# Altium PCB TL-WR703N.PcbDoc (part 3 of 3)
Units mm, origin at the board's own origin, x right, y up, seen from the top; angles counter-clockwise.
Board outline 48.52 x 50.08 mm, 2 copper layers (Top, Bottom); 241 components, 226 nets, 742 pads, 501 vias.
Unrouted connection lines stored in the file: 88.
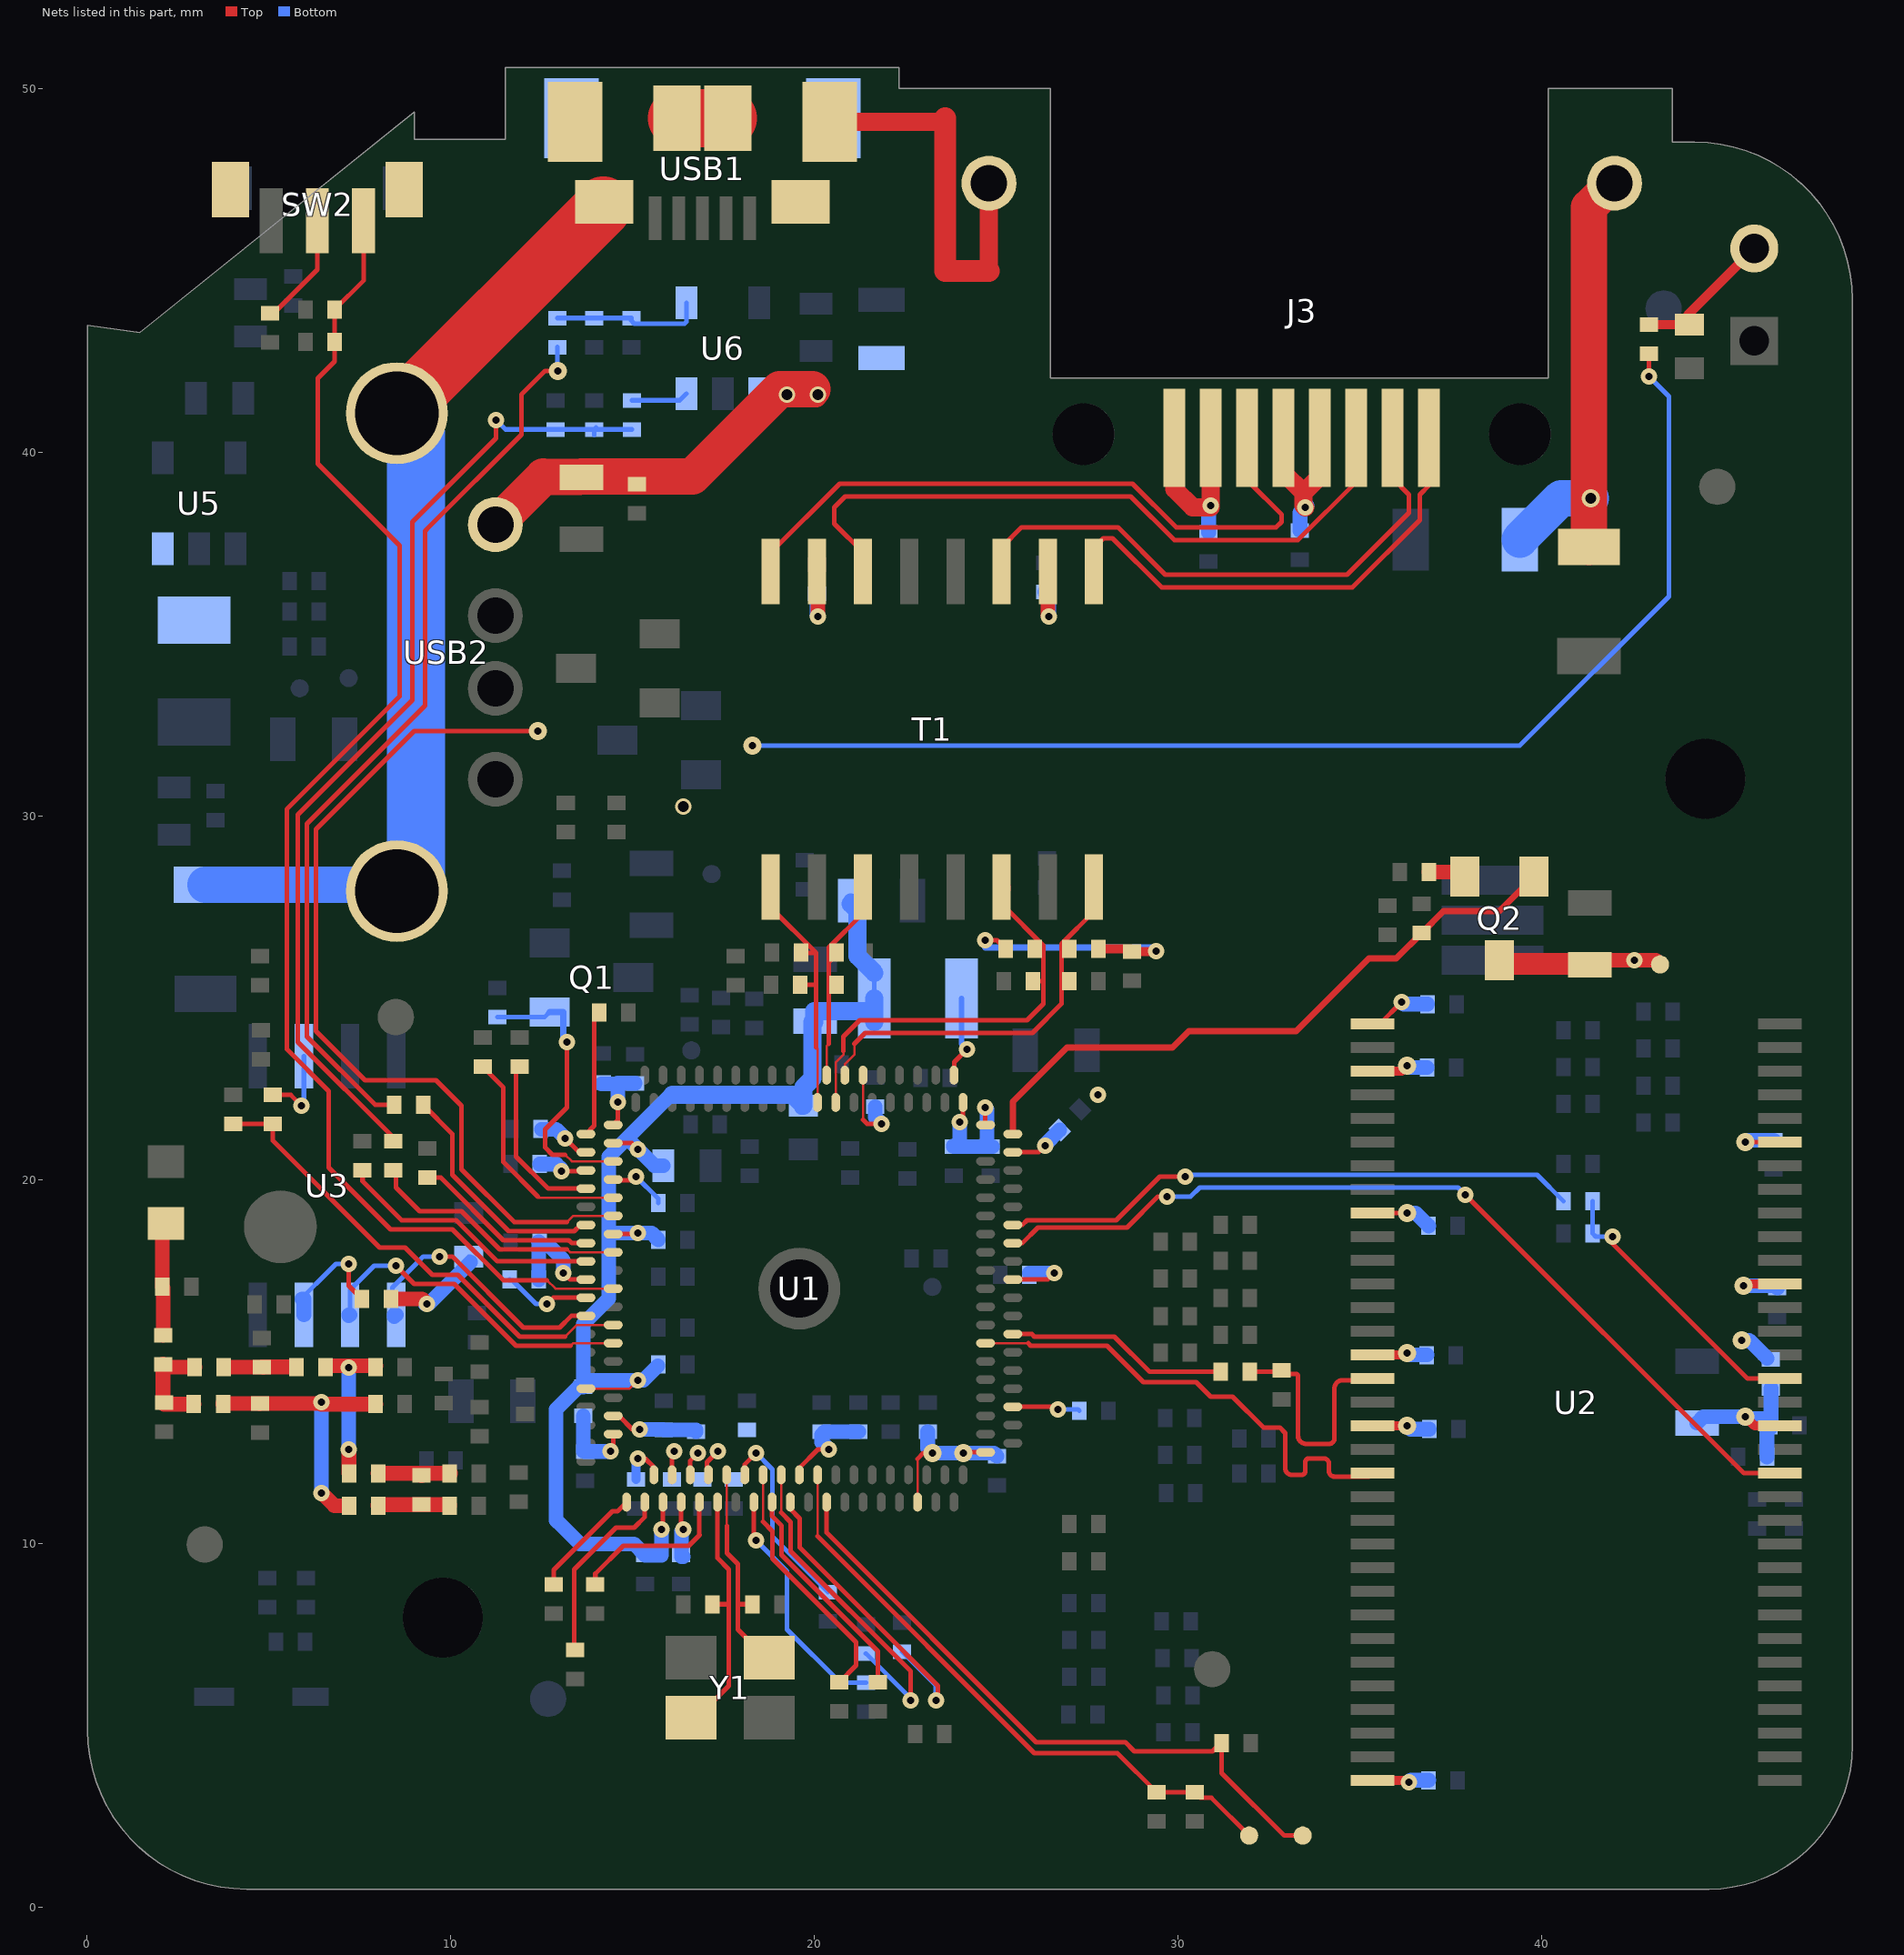
[diagram p3: the nets of this part, all layers, seen from the top]

## Via types
v1: diameter 0.45, hole 0.3, Top to Bottom, 286 vias
v2: diameter 0.45, hole 0.2, Top to Bottom, 152 vias
v3: diameter 0.6, hole 0.4, Top to Bottom, 31 vias
v4: diameter 0.5, hole 0.2, Top to Bottom, 21 vias
v5: diameter 0.5, hole 0.3, Top to Bottom, 11 vias

## Nets (pads, with @x,y where several pads share a name; then routed paths per layer and width w, separated by ;. In a path a pad name is that pad's centre, name@x,y a point inside that pad or via, vN(x,y) a via of type N, cw(c..) or ccw(c..) an arc to the next point about the centre after c; other vN are vias at no path point) (continued)
GPIO1: R2.2 U1.A77 | length 8.9
  Top w0.127: U1.A77@19.35,11.131 19.35,10.943 19.611,10.682 19.611,9.882 21.611,7.882 23.411,6.082 23.411,5.732 v2(23.361,5.682)
  Bottom w0.127: R2.2@22.417,7.021 23.35,6.088 23.35,5.7 23.35,5.682 v2(23.361,5.682)
GPIO6: R16.2 U1.B46 | length 7.2
  Top w0.064: 13.211,18.082 13.293,18 U1.B46@14.481,18
  Top w0.127: R16.2@8.428,20.256 8.511,20.173 8.511,19.782 9.161,19.132 10.311,19.132 11.361,18.082 13.211,18.082
GPIO7: R15.2 U1.A54 | length 7.4
  Top w0.127: R15.2@7.589,20.256 7.589,19.954 8.661,18.882 10.161,18.882 11.293,17.75 U1.A54@13.731,17.75
GPIO8: R18.2 U1.A52 | length 6.6
  Top w0.127: R18.2@9.259,22.053 10.061,21.251 10.061,20.132 11.611,18.582 ; 11.611,18.582 11.661,18.582 13.411,18.582 13.579,18.75 U1.A52@13.731,18.75
GPIO11: C62.2 R92.2 SW2.3 U1.B48 | length 38.4
  Top w0.064: 12.661,17.232 12.893,17 U1.B48@14.481,17
  Top w0.127: SW2.3@7.616,46.36 7.616,44.713 C62.2@6.823,43.92 R92.2@6.823,43.031 6.823,42.494 6.361,42.032 6.361,39.682 8.611,37.432 8.611,33.282 5.511,30.182 5.511,23.582 6.661,22.432 6.661,20.332 8.361,18.632 10.061,18.632 11.461,17.232 12.661,17.232
GPIO13: R3.2 U1.B66 | length 9.5
  Top w0.064: 19.1,10.843 U1.B66@19.1,11.881
  Top w0.127: 19.1,10.843 19.361,10.582 19.361,9.782 22.661,6.482 v2(22.661,5.682)
  Bottom w0.127: R3.2@21.428,6.971 22.661,5.738 22.661,5.732 v2(22.661,5.682)
GPIO14: R11.2 U1.A76 | length 6.2
  Top w0.127: U1.A76@18.85,11.131 18.85,10.743 19.111,10.482 19.111,9.682 21.761,7.032 21.759,7.03 R11.2@21.759,6.174
GPIO15: R12.2 U1.B65 | length 7
  Top w0.064: 18.6,10.593 U1.B65@18.6,11.881
  Top w0.127: 18.6,10.593 18.861,10.332 18.861,9.582 21.161,7.282 21.161,6.642 R12.2@20.693,6.174
GPIO16: R13.1 U1.A75 | length 6.6
  Top w0.127: U1.A75@18.35,11.131 18.35,10.143 v2(18.411,10.082)
  Bottom w0.127: v2(18.411,10.082) 19.261,9.232 19.261,7.632 20.723,6.17 R13.1@21.428,6.17
GPIO17: R14.1 U1.B64 | length 5.4
  Top w0.127: U1.B64@18.1,11.881 18.1,12.171 v2(18.411,12.482)
  Bottom w0.127: v2(18.411,12.482) 18.861,12.032 18.861,11.982 ; 18.861,11.932 18.861,11.982 ; R14.1@20.385,8.66 18.861,10.184 18.861,11.982
GPIO29: R17.2 U1.A53 | length 5.1
  Top w0.127: R17.2@9.367,20.052 9.741,20.052 11.461,18.332 13.261,18.332 13.343,18.25 U1.A53@13.731,18.25
LDM: U1.B7 U2.20 | length 13.6
  Top w0.064: U1.B7@24.719,15.5 25.893,15.5
  Top w0.127: 25.893,15.5 25.961,15.432 28.061,15.432 29.061,14.432 30.511,14.432 30.911,14.032 31.511,14.032 32.361,13.182 32.811,13.182 32.961,13.032 32.961,12.032 ccw(c33.136,12.057) 33.161,11.882 33.411,11.882 ccw(c33.411,11.982) 33.511,11.982 33.511,12.232 cw(c33.611,12.232) 33.611,12.332 34.011,12.332 cw(c34.011,12.182) 34.161,12.182 34.161,11.982 ccw(c34.311,11.982) 34.311,11.832 34.961,11.832 cw(c34.986,11.807) 35.011,11.832 U2.20@35.261,11.832 ; U2.20@35.355,11.925 U2.20@35.261,11.832 ; U2.20@35.355,11.925 U2.20@35.262,11.832
LDO: R16.1 R107.1 R108.1 R110.1 | length 27.4
  Top w0.127: R16.1@8.428,21.056 8.428,21.165 5.811,23.782 5.811,30.032 8.961,33.182 8.961,38.082 11.261,40.382 v2(11.261,40.882)
  Bottom w0.127: v2(11.261,40.882) 11.521,40.622 R110.1@12.896,40.622 R108.1@13.962,40.622 ; R108.1@13.962,40.472 R108.1@13.962,40.622 ; R108.1@13.962,40.482 R108.1@13.962,40.622 ; R108.1@14.011,40.682 R108.1@14.011,40.622 ; R107.1@15.001,40.622 R108.1@14.011,40.622 ; R108.1@13.962,40.622 R108.1@14.011,40.622
LDQS: R50.2 U1.A9 | length 6.1
  Top w0.127: U1.A9@25.469,15.75 25.993,15.75 26.061,15.682 28.261,15.682 29.229,14.714 R50.2@31.184,14.714
LDQS_B: R50.1 R52.1 U2.16 | length 7
  Top w0.127: R50.1@31.984,14.714 32.811,14.714 32.811,14.682 32.854,14.682 32.854,14.756 32.854,14.656 33.237,14.656 cw(c33.237,14.582) 33.311,14.582 33.311,12.982 ccw(c33.536,12.957) 33.511,12.732 34.161,12.732 ccw(c34.161,12.882) 34.311,12.882 34.311,14.282 cw(c34.536,14.257) 34.561,14.482 35.298,14.482 cw(c35.348,14.475) U2.16@35.355,14.525
LED3: R83.1 U1.B44 | length 58.1
  Top w0.064: 13.211,18.832 13.379,19 U1.B44@14.481,19
  Top w0.127: v4(12.411,32.332) 9.011,32.332 6.311,29.632 6.311,24.082 7.661,22.732 9.611,22.732 10.311,22.032 10.311,20.282 11.761,18.832 13.211,18.832 ; R83.1@42.96,42.708 42.96,42.633 R83.1@42.961,42.632 ; v2(42.961,42.082) R83.1@42.961,42.632 ; R83.1@43.011,42.682 R83.1@42.961,42.632
  Bottom w0.127: v4(18.311,31.932) 39.411,31.932 43.511,36.032 43.511,41.532 v2(42.961,42.082)
LX: L14.2 U5.3
N$1: C79.1 U1.A71 | length 1.4
  Top w0.127: U1.A71@16.35,11.131 16.35,10.443 v2(16.411,10.382)
  Bottom w0.406: C79.1@16.361,9.732 16.361,10.332 v2(16.411,10.382)
N$2: 
  other v1: 16.403,30.25
RD+: C50.2 R76.2 T1.6 U1.B27 | length 12.3
  Top w0.064: U1.B27@20.6,22.119 20.6,23.221 20.811,23.432 20.811,23.532
  Top w0.127: 20.811,23.532 20.811,23.932 21.261,24.382 25.861,24.382 26.311,24.832 26.311,25.282 ; T1.6@25.211,27.982 25.211,27.532 26.311,26.432 ; C50.2@26.019,25.455 26.311,25.455 ; R76.2@26.069,26.344 26.311,26.344 ; 26.311,25.282 26.311,25.455 ; 26.311,25.282 26.311,25.455 ; 26.311,25.455 26.311,26.282 26.311,26.344 ; 26.311,26.344 26.311,26.432 ; 26.311,26.344 26.311,26.432
  Top w0.406: T1.6@25.161,28.041 25.211,28.04 T1.6@25.211,27.982
RD-: C53.1 R77.1 T1.8 U1.A31 | length 11.4
  Top w0.064: U1.A31@20.85,22.869 20.85,23.171 21.111,23.432 21.111,23.732
  Top w0.127: 21.111,23.732 21.411,24.032 26.011,24.032 26.811,24.832 26.811,25.382 ; C53.1@27.02,25.455 27.02,25.382 26.811,25.382 ; T1.8@27.701,28.041 27.701,27.372 26.811,26.482 26.811,26.344 ; 26.811,25.382 26.811,26.182 26.811,26.344 ; 26.811,26.344 R77.1@27.02,26.344 26.811,26.344
RX+: J3.7 T1.11 | length 15.6
  Top w0.127: T1.11@25.161,36.715 25.161,37.382 25.711,37.932 28.361,37.932 29.661,36.632 34.661,36.632 36.361,38.332 36.361,38.832 35.912,39.281 J3.7@35.912,40.391
RX-: J3.8 T1.9 | length 13.4
  Top w0.127: T1.9@27.701,36.715 27.701,37.372 27.961,37.632 28.211,37.632 29.561,36.282 34.811,36.282 36.661,38.132 36.661,38.832 36.912,39.083 J3.8@36.912,40.391
RX_GND: R71.2 T1.10 | length 2
  Top w0.406: T1.10@26.431,36.715 26.431,35.512 v2(26.461,35.482)
  Bottom w0.406: R71.2@26.354,36.154 26.461,36.047 v2(26.461,35.482)
S$15: C99.2 C100.2 U1.B67 | length 2.8
  Top w0.127: U1.B67@19.6,11.881 19.6,12.071 20.111,12.582 v2(20.411,12.582)
  Bottom w0.127: C100.2@20.208,13.067 C100.2@20.296,13.067
  Bottom w0.406: v2(20.411,12.582) 20.211,12.782 20.211,12.982 20.296,13.067 C99.2@21.224,13.067
S$17: C19.1 C20.2 L3.2 L7.2 | length 7.7
  Top w0.406: L3.2@3.752,13.825 3.752,13.844 3.802,13.844 C20.2@4.761,13.844 ; C20.2@4.761,13.832 C20.2@4.761,13.844 ; v2(6.461,11.382) 6.812,11.031 L7.2@7.216,11.031 ; v2@6.461,13.832 v2@6.461,13.825 ; C19.1@7.951,13.825 v2@6.461,13.825 ; C20.2@4.761,13.844 C20.2@4.772,13.844 6.461,13.844 v2(6.461,13.882) v2@6.461,13.825
  Bottom w0.406: v2(6.461,11.382) v2(6.461,13.882)
S$18: C3.1 C38.1 C80.1 C82.2 C104.1 C105.1 L1.2 L13.1 R94.1 U1.A61 U1.A70 U1.B40 | length 36.5
  Top w0.064: U1.A61@13.731,14.25 14.929,14.25 v2(15.161,14.482)
  Top w0.127: U1.B40@14.481,21 14.993,21 v2(15.161,20.832) ; v2(15.811,10.382) 15.85,10.421 U1.A70@15.85,11.131
  Bottom w0.127: L1.2@13.527,14.298 L1.2@13.658,14.298 ; C82.2@15.711,14.882 15.711,14.904 C82.2@15.721,14.914 ; 16.111,22.332 16.111,22.382 ; C105.1@19.962,23.169 C105.1@19.962,23.182 ; C104.1@19.962,24.332 C104.1@19.962,24.351 ; L13.1@21.661,24.982 L13.1@21.661,25.682
  Bottom w0.406: L1.2@13.527,14.298 12.911,13.682 12.911,10.632 12.961,10.582 13.561,9.982 15.053,9.982 15.359,9.676 15.811,9.676 v2(15.811,10.382) ; C82.2@15.711,14.882 15.311,14.482 v2(15.161,14.482) 15.111,14.482 13.658,14.482 L1.2@13.658,14.298 13.661,14.298 13.661,16.032 14.361,16.732 14.361,20.632 14.861,21.132 ; C3.1@15.861,20.382 15.611,20.382 v2(15.161,20.832) 14.861,21.132 ; 16.111,22.382 14.861,21.132 ; 16.361,9.632 16.411,9.632 ; R94.1@19.661,21.982 R94.1@19.711,22.032 ; C104.1@19.962,24.351 C104.1@20.031,24.351 ; C38.1@21.009,27.664 21.011,27.664 C38.1@21.011,27.582
  Bottom w0.5: 16.111,22.332 19.411,22.332 ; R94.1@19.711,22.032 19.411,22.332 ; R94.1@19.711,22.132 19.711,22.332 ; C105.1@19.961,23.182 19.961,22.782 19.711,22.532 19.711,22.332 ; C105.1@19.962,23.169 19.962,24.332 20.011,24.332 20.011,24.632 20.311,24.632 21.661,24.632 L13.1@21.661,24.982 L13.1@21.661,24.332 ; C38.1@21.011,27.582 21.2,27.393 21.2,26.25 21.2,26.143 L13.1@21.661,25.682 ; 19.411,22.332 19.711,22.332
S$36: C65.1 U1.A12 | length 2
  Top w0.127: U1.A12@25.469,17.25 26.429,17.25 v2(26.611,17.432)
  Bottom w0.127: C65.1@25.915,17.377 25.92,17.382 C65.1@25.92,17.432
  Bottom w0.406: C65.1@25.92,17.432 v2(26.611,17.432)
S$44: C16.2 C17.2 R59.2 R61.1 U2.49 | length 5.4
  Top w0.254: v4(45.611,13.482) 45.868,13.225 U2.49@46.555,13.225
  Bottom w0.127: v4@45.611,13.432 v4(45.611,13.482) ; C17.2@46.293,13.24 46.311,13.222 C17.2@46.311,13.182
  Bottom w0.406: C16.2@44.28,13.302 44.46,13.482 v4(45.611,13.482) ; v4@45.611,13.432 46.311,13.432 46.311,13.182 46.204,13.075 R61.1@46.204,12.374 ; C17.2@46.293,13.24 46.312,13.24 R59.2@46.312,14.26
S$48: 
S$54: C51.2 R76.1 R77.2 | length 7.3
  Top w0.127: v2(24.711,26.582) 25.031,26.582 R76.1@25.269,26.344 ; C51.2@28.711,26.344 28.74,26.344 C51.2@28.74,26.263
  Top w0.254: R77.2@27.82,26.344 C51.2@28.711,26.344 ; C51.2@28.74,26.263 29.411,26.263 v2(29.411,26.282)
  Bottom w0.175: v2(24.711,26.582) 24.711,26.382 24.911,26.382 28.361,26.382 29.311,26.382 v2(29.411,26.282)
S$55: LED2.K LED3.C R83.2 | length 4
  Top w0.127: LED3.C@43.972,43.508 44.018,43.554 LED3.C@44.026,43.554
  Top w0.254: R83.2@42.96,43.508 LED3.C@43.972,43.508 ; LED3.C@44.076,43.504 44.026,43.554 44.026,43.77 LED2.K@45.854,45.598
S$69: 
S$70: 
S$73: C34.1 L6.2 L7.1 | length 2
  Top w0.406: L7.1@8.016,11.031 8.016,11.062 C34.1@9.213,11.062 9.983,11.062 L6.2@9.983,11.031
S$76: C1.1 L1.1 U1.B56 | length 2.2
  Top w0.127: v2(14.411,12.532) 14.481,12.602 U1.B56@14.481,13
  Bottom w0.127: C1.1@13.661,12.532 13.708,12.532 C1.1@13.708,12.52
  Bottom w0.406: L1.1@13.658,13.498 13.658,12.532 C1.1@13.661,12.532 ; C1.1@13.708,12.52 14.399,12.52 v2(14.411,12.532)
S$78: R58.1 R95.2 | length 3
  Top w0.406: R58.1@8.37,16.719 9.224,16.719 v2(9.361,16.582)
  Bottom w0.127: R95.2@10.511,17.882 10.561,17.882 R95.2@10.561,17.732
  Bottom w0.406: v2@9.311,16.582 v2(9.361,16.582) 9.411,16.582 R95.2@10.561,17.732
S$80: C21.2 C27.1 C28.1 L3.1 | length 2.9
  Top w0.406: L3.1@2.952,13.825 2.132,13.825 2.132,13.867 2.105,13.867 C28.1@2.105,14.922 2.105,14.841 C27.1@2.975,14.841
S$87: C28.2 C30.1 J1.1 | length 3.2
  Top w0.406: C28.2@2.105,15.722 2.105,15.782 2.111,15.782 2.111,17.025 C30.1@2.086,17.05 2.086,18.79 J1.1@2.182,18.79
S$94: C26.1 C27.2 L5.1 | length 2.1
  Top w0.406: C27.2@3.775,14.841 L5.1@4.861,14.841 ; L5.1@4.861,14.832 L5.1@4.861,14.841 ; C26.1@5.769,14.841 5.769,14.845 L5.1@4.822,14.845 4.822,14.841 L5.1@4.861,14.841
S$95: R20.1 U1.A47 | length 3.5
  Top w0.127: U1.A47@13.731,21.25 13.961,21.48 13.961,21.932 13.961,24.457 R20.1@14.097,24.593
S$102: C86.2 U1.B42 | length 1.7
  Top w0.127: U1.B42@14.481,20 14.461,20 14.461,19.982 14.511,19.982 15.011,19.982 v2(15.111,20.082)
  Bottom w0.127: v2(15.111,20.082) 15.721,19.472 C86.2@15.721,19.359
S$103: C5.1 C87.1 U1.B19 U1.B20 | length 4.2
  Top w0.127: v2(24.011,21.582) 24.1,21.671 U1.B20@24.1,22.119 ; v2(24.711,21.982) 24.711,21.932 24.711,21.508 U1.B19@24.719,21.5
  Bottom w0.406: v2(24.011,21.582) 24.011,20.932 23.841,20.932 C87.1@23.841,20.902 C5.1@24.761,20.902 ; v2(24.711,21.982) 24.761,21.932 C5.1@24.761,20.902 ; C5.1@24.911,20.902 C5.1@24.857,20.902 ; C5.1@24.761,20.902 C5.1@24.857,20.902 ; C5.1@24.761,20.902 C5.1@24.857,20.902
S$106: R91.2 SW2.2 | length 3.2
  Top w0.127: R91.2@5.049,43.812 5.049,43.794 5.061,43.782 5.111,43.782 6.346,45.017 SW2.2@6.346,46.36
S$107: SW2.S$1 SW2.S$2
S$109: 
S$110: USB1.P$1 USB1.P$2
S$111: 
S$114: C35.2 U1.A72 | length 4.5
  Top w0.127: C35.2@13.989,8.864 13.989,9.16 14.761,9.932 16.561,9.932 16.861,10.232 16.85,10.243 U1.A72@16.85,11.131
S$115: L11.2 U1.A69 | length 5.2
  Top w0.127: L11.2@13.412,7.082 L11.2@13.431,7.063 ; L11.2@13.461,7.032 13.411,7.082 13.411,9.282 14.561,10.432 15.061,10.432 15.35,10.721 U1.A69@15.35,11.131
S$116: R7.1 U1.B59 | length 1.3
  Top w0.127: v2(15.161,12.332) 15.361,12.332 15.6,12.093 U1.B59@15.6,11.881
  Bottom w0.254: R7.1@15.105,11.758 15.111,11.764 15.111,12.282 v2(15.161,12.332)
S$117: C88.1 C89.1 C90.1 R96.1 U1.B60 U1.B61 U1.B62 | length 2.3
  Top w0.127: U1.B60@16.1,11.881 16.1,12.471 v2(16.161,12.532) v2@16.161,12.432 ; U1.B61@16.6,11.881 16.6,12.271 v2(16.811,12.482) ; U1.B62@17.1,11.881 17.061,11.92 17.061,11.932 17.061,12.232 v2(17.361,12.532)
S$121: C63.2 U1.A19 | length 1.6
  Top w0.127: U1.A19@25.469,20.75 26.179,20.75 v2(26.361,20.932)
  Bottom w0.406: v2(26.361,20.932) 26.361,20.967 C63.2@26.756,21.362
S$122: C81.2 U1.B45 | length 2.1
  Top w0.127: U1.B45@14.481,18.5 15.129,18.5 v2(15.161,18.532)
  Bottom w0.406: 14.361,18.532 v2(15.161,18.532) 15.532,18.532 C81.2@15.721,18.343
S$124: 
S$125: C91.2 R97.1 U1.B55 | length 2.5
  Top w0.127: U1.B55@14.481,13.5 14.643,13.5 15.011,13.132 v2(15.211,13.132)
  Bottom w0.406: v2(15.211,13.132) 15.867,13.132 C91.2@15.867,13.117 ; C91.2@15.852,13.132 C91.2@15.867,13.117 ; R97.1@16.756,13.067 16.756,13.117 C91.2@15.867,13.117
S$127: C34.2 L8.2 L9.1 | length 2.1
  Top w0.406: L9.1@8.016,11.92 C34.2@9.213,11.92 ; L8.2@10.011,11.932 10.011,11.912 9.983,11.912 L8.2@9.983,11.92 C34.2@9.213,11.92 ; C34.2@9.213,11.92 C34.2@9.213,11.862 C34.2@9.213,11.92
S$128: R109.2 R111.2 R112.2 U6.4 | length 4.2
  Bottom w0.127: R112.2@12.946,43.685 R109.2@13.962,43.685 R111.2@14.978,43.685 14.978,43.615 15.061,43.532 16.441,43.532 16.491,43.582 U6.4@16.491,44.104
S$129: 
S$130: C25.1 C26.2 L9.2 | length 5.1
  Top w0.127: C25.1@7.951,14.841 7.951,14.872 C25.1@7.961,14.882
  Top w0.406: C26.2@6.569,14.841 6.569,14.882 6.628,14.882 v2@7.211,14.882 ; v2(7.211,12.582) 7.216,12.577 L9.2@7.216,11.92 ; C25.1@7.961,14.882 v2@7.211,14.882 ; v2@7.211,14.882 v2(7.211,14.832) v2@7.211,14.882
  Bottom w0.127: 7.261,13.082 v2@7.261,12.582 ; v2@7.261,12.582 v2(7.211,12.582) v2@7.261,12.582
  Bottom w0.406: v2(7.211,12.582) v2(7.211,14.832)
S$133: C96.2 C102.2 U1.B39 | length 2.7
  Top w0.127: U1.B39@14.481,21.5 14.611,21.63 v2(14.611,22.132)
  Bottom w0.127: C102.2@14.161,22.632 14.161,22.669 C102.2@14.166,22.669
  Bottom w0.406: C102.2@14.161,22.632 14.611,22.632 v2(14.611,22.132) 14.611,22.646 C96.2@15.082,22.646
S$134: 
S$135: C97.1 U1.A49 | length 1.4
  Top w0.127: v2(13.061,20.232) 13.713,20.232 U1.A49@13.731,20.25
  Bottom w0.406: C97.1@12.457,20.425 12.918,20.425 13.061,20.282 v2(13.061,20.232)
S$136: C98.1 R84.1 U1.A55 | length 3
  Top w0.127: v2(13.111,17.432) 13.293,17.25 U1.A55@13.731,17.25
  Bottom w0.127: C98.1@12.434,18.289 12.457,18.289 C98.1@12.457,18.266 12.457,18.182 C98.1@12.461,18.182
  Bottom w0.406: C98.1@12.43,18.289 12.434,18.289 R84.1@12.434,17.25 ; C98.1@12.461,18.182 12.711,18.182 13.061,17.832 13.111,17.782 v2(13.111,17.432)
S$137: R58.2 U3.7 | length 3.7
  Top w0.127: v2(7.211,17.682) 7.211,17.078 R58.2@7.57,16.719
  Bottom w0.127: U3.7@5.911,16.732 U3.7@5.926,16.717 ; U3.7@5.976,16.276 5.976,16.797 6.611,17.432 6.861,17.682 v2(7.211,17.682)
  Bottom w0.406: U3.7@5.926,16.717 5.976,16.717 U3.7@5.976,16.276
S$138: R84.2 U1.A56 | length 2.5
  Top w0.127: v2(12.661,16.582) 12.829,16.75 U1.A56@13.731,16.75
  Bottom w0.127: R84.2@11.634,17.25 11.634,17.232 11.711,17.232 12.361,16.582 v2(12.661,16.582)
S$139: 
S$140: 
S$141: 
S$145: L13.2 U1.A25 | length 2.4
  Top w0.127: U1.A25@23.85,22.869 23.861,22.88 U1.A25@23.861,22.982 ; U1.A25@23.861,22.932 U1.A25@23.861,22.982 ; v2(24.211,23.582) 23.861,23.232 U1.A25@23.861,22.982
  Bottom w0.15: L13.2@24.061,24.982 24.061,23.732 v2(24.211,23.582)
S$146: 
S$151: 
S$152: C2.1 U1.A48 | length 1.5
  Top w0.127: v2(13.161,21.132) 13.543,20.75 U1.A48@13.731,20.75
  Bottom w0.127: C2.1@12.484,21.391 12.511,21.391 C2.1@12.511,21.382
  Bottom w0.406: C2.1@12.511,21.382 12.911,21.382 v2(13.161,21.132)
S$153: 
S$155: 
S$158: 
S$163: 
S$166: 
S$167: 
S$168: 
S$169: 
S$170: 
S$173: 
S$174: 
S$175: 
S$176: 
S$177: 
S$179: 
S$181: 
S$183: 
S$184: 
S$185: 
S$186: 
S$187: 
S$188: 
S$191: 
S$192: C64.2 C66.2 U1.A84 U1.B1 | length 4.7
  Top w0.064: U1.A84@22.85,11.131 22.85,12.321
  Top w0.127: 22.85,12.321 23.011,12.482 v4(23.261,12.482) ; v4(24.111,12.482) 24.129,12.5 U1.B1@24.719,12.5
  Bottom w0.406: C64.2@23.129,13.067 23.129,12.614 v4(23.261,12.482) 23.411,12.482 v4(24.111,12.482) 24.945,12.482 C66.2@25.034,12.393
S$194: R107.2 U6.3 | length 1.6
  Bottom w0.127: R107.2@15.001,41.422 16.309,41.422 U6.3@16.491,41.604
S$195: 
S$196: 
S$197: 
S$198: 
S$200: 
S$201: 
S$203: Q1.1 R93.1 U1.B41 | length 7.9
  Top w0.064: 13.161,20.682 13.343,20.5 U1.B41@14.481,20.5
  Top w0.127: 13.161,20.682 12.811,20.682 12.611,20.882 12.611,21.382 13.211,21.982 v2(13.211,23.782)
  Bottom w0.127: R93.1@11.295,24.47 12.6,24.47 Q1.1@12.735,24.605
  Bottom w0.175: Q1.1@12.735,24.605 13.111,24.605 13.111,24.132 13.111,23.882 v2(13.211,23.782)
S$290: J3.1 J3.2 R65.1 | length 5.3
  Top w0.5: J3.1@29.912,40.391 29.912,38.981 30.411,38.482 30.911,38.482 v2(30.911,38.532) v2@30.911,38.582 ; v2@30.912,38.581 J3.2@30.912,40.391
  Bottom w0.406: R65.1@30.849,37.793 30.849,38.47 v2(30.911,38.532)
S$291: J3.4 J3.5 R68.1 | length 4.7
  Top w0.5: J3.4@32.912,40.391 32.912,39.431 33.461,38.882 ; v2(33.511,38.482) 33.461,38.532 33.461,38.882 ; J3.5@33.912,40.391 33.912,39.333 33.461,38.882
  Bottom w0.127: v2(33.511,38.482) v2@33.561,38.532
  Bottom w0.406: R68.1@33.362,37.843 33.362,38.333 v2@33.561,38.532
S$354: C36.2 U1.A68 | length 3.2
  Top w0.127: C36.2@12.846,8.864 12.846,9.267 14.461,10.882 14.601,10.882 U1.A68@14.85,11.131
S$380: Q2.2 R106.1 | length 1
  Top w0.406: R106.1@36.91,28.453 37.776,28.453 Q2.2@37.896,28.333
S$409: C93.2 U1.A30 | length 2.3
  Top w0.064: 21.35,21.643 U1.A30@21.35,22.869
  Top w0.127: 21.35,21.643 21.461,21.532 v2(21.861,21.532)
  Bottom w0.406: C93.2@21.682,22.007 21.682,21.711 v2(21.861,21.532)
S$427: 
  other v2: 27.811,22.332
S$430: Q2.1 R98.1 U1.A20 | length 17.8
  Top w0.175: U1.A20@25.469,21.25 25.469,22.14 25.511,22.182 26.961,23.632 29.861,23.632 30.311,24.082 33.261,24.082 35.261,26.082 36.013,26.082 R98.1@36.714,26.783 37.313,27.382 38.161,27.382 38.845,27.382 Q2.1@39.796,28.333
S$434: C72.2 U1.A5 | length 1.9
  Top w0.127: U1.A5@25.469,13.75 26.643,13.75 v2(26.711,13.682)
  Bottom w0.127: v2(26.711,13.682) 27.263,13.682 C72.2@27.301,13.644
SHIELD: C37.2 C45.1 C114.1 J3.S$1 J3.S$2 USB1.S$1 USB1.S$2 USB1.S$3 USB1.S$4 USB1.S$5 USB1.S$6 USB2.S$1 USB2.S$2 | length 53.8
  Top w0.127: v5@41.309,38.63 41.309,38.68 v5(41.361,38.732) v5@41.311,38.682 ; J3.S$2@42.011,47.432 J3.S$2@42.012,47.391 J3.S$2@42.012,47.391
  Top w0.5: USB1.S$1@20.433,49.077 23.611,49.077 23.611,49.182 ; 24.812,44.982 J3.S$1@24.812,47.391 ; v5@41.311,38.632 v5@41.311,38.682
  Top w0.6: 23.611,49.182 23.611,49.077 23.611,44.982 24.812,44.982
  Top w1: J3.S$2@42.011,47.432 41.309,46.73 41.309,44.738 v5@41.309,38.63 ; v5@41.309,38.63 C37.2@41.309,37.396 v5@41.309,38.63
  Top w1.6: USB2.S$1@8.531,41.072 14.211,46.752 USB1.S$5@14.211,46.782 ; USB1.S$4@16.233,49.177 USB1.S$3@17.456,49.177 ; USB1.S$3@17.461,49.182 USB1.S$3@17.456,49.177 ; USB1.S$3@17.633,49.177 USB1.S$3@17.456,49.177
  Bottom w1: C114.1@3.271,28.098 8.531,28.098 USB2.S$2@8.531,27.932 ; C45.1@39.407,37.597 40.542,38.732 v5(41.361,38.732)
  Bottom w1.6: USB2.S$2@8.531,27.932 9.061,28.462 9.061,30.182 9.061,40.502 8.531,41.032 USB2.S$1@8.531,41.072
SPI_CLK: U1.B51 U3.6 | length 9.2
  Top w0.064: 13.311,15.432 13.379,15.5 U1.B51@14.481,15.5
  Top w0.127: v2(8.511,17.632) 9.011,17.132 10.111,17.132 11.811,15.432 13.311,15.432
  Bottom w0.127: U3.6@7.211,16.232 U3.6@7.211,16.261 ; U3.6@7.246,16.276 7.246,16.967 7.911,17.632 v2(8.511,17.632)
  Bottom w0.406: U3.6@7.211,16.261 7.211,16.276 U3.6@7.246,16.276
SPI_MISO: R57.2 R60.2 U1.B50 | length 13.3
  Top w0.064: 13.161,15.682 13.479,16 U1.B50@14.481,16
  Top w0.127: R60.2@4.037,21.526 R57.2@5.126,21.526 5.126,21.067 8.061,18.132 8.761,18.132 9.511,17.382 10.211,17.382 11.911,15.682 13.161,15.682
SPI_MOSI: U1.A57 U3.5 | length 7.5
  Top w0.127: v2(9.711,17.882) 10.061,17.882 12.011,15.932 13.011,15.932 13.329,16.25 U1.A57@13.731,16.25
  Bottom w0.127: U3.5@8.461,16.232 8.411,16.282 8.411,17.032 9.111,17.732 9.261,17.882 v2(9.711,17.882)
  Bottom w0.406: U3.5@8.461,16.232 8.461,16.276 U3.5@8.516,16.276
SPI_SO: R57.1 U3.2 | length 2.4
  Top w0.127: R57.1@5.126,22.326 5.617,22.326 v2(5.911,22.032)
  Bottom w0.127: v2@5.926,22.097 5.911,22.082 v2(5.911,22.032) 5.976,22.097 U3.2@5.976,23.388
TD+: C48.2 R78.2 T1.1 U1.B28 | length 7.3
  Top w0.064: 20.061,23.632 20.1,23.593 U1.B28@20.1,22.119
  Top w0.127: T1.1@18.811,28.041 18.811,27.482 20.061,26.232 ; C48.2@19.619,25.355 20.061,25.355 20.061,25.332 ; R78.2@19.646,26.244 19.646,26.232 20.061,26.232 ; 20.061,23.632 20.061,25.332 ; 20.061,25.332 20.061,26.232
TD-: C49.1 R79.1 T1.3 U1.A32 | length 6.2
  Top w0.064: U1.A32@20.35,22.869 20.35,23.671 20.411,23.732
  Top w0.127: 20.411,23.732 20.411,25.332 ; C49.1@20.62,25.355 20.411,25.355 20.411,25.332 ; R79.1@20.62,26.244 20.62,26.191 20.411,25.982 ; T1.3@21.351,28.041 21.351,27.322 20.411,26.382 20.411,26.232 20.411,25.982 ; 20.411,25.332 20.411,25.982
TP_IN: C57.2 R82.2 TP_IN.1 U1.B68 | length 17
  Top w0.064: 20.1,10.193 U1.B68@20.1,11.881
  Top w0.127: 20.1,10.193 20.15,10.143 26.061,4.232 28.342,4.232 R82.2@29.425,3.149 C57.2@30.468,3.149 30.618,2.999 30.711,2.999 30.93,2.999 TP_IN.1@31.965,1.964
TP_OUT: C55.1 TP_OUT.1 U1.A79 | length 18.1
  Top w0.127: U1.A79@20.35,11.131 20.35,10.293 26.111,4.532 ; 26.111,4.532 28.561,4.532 28.811,4.282 30.811,4.282 30.961,4.282 31.211,4.532 C55.1@31.211,4.504 31.211,3.682 31.311,3.582 32.929,1.964 TP_OUT.1@33.439,1.964
TX+: J3.3 T1.16 | length 18.6
  Top w0.127: T1.16@18.811,36.715 18.811,37.232 20.711,39.132 28.761,39.132 29.961,37.932 30.061,37.932 32.711,37.932 32.861,38.082 32.861,38.282 31.961,39.182 31.912,39.231 J3.3@31.912,40.391
TX-: J3.6 T1.14 | length 18.9
  Top w0.127: T1.14@21.351,36.715 21.351,37.242 20.561,38.032 20.561,38.482 20.861,38.782 28.711,38.782 29.911,37.582 33.311,37.582 34.912,39.183 J3.6@34.912,40.391
TX_GND: R64.2 T1.15 | length 1.9
  Top w0.406: T1.15@20.081,36.715 20.111,36.685 v2(20.111,35.482)
  Bottom w0.406: R64.2@20.081,36.104 20.081,35.512 v2(20.111,35.482)
UDM: U1.A14 U2.47 | length 25
  Top w0.127: U1.A14@25.469,18.25 25.729,18.25 26.161,18.682 26.561,18.682 28.611,18.682 29.461,19.532 v2(29.711,19.532) ; v2(37.911,19.582) 45.568,11.925 U2.47@46.555,11.925
  Bottom w0.127: v2(29.711,19.532) 30.361,19.532 30.611,19.782 30.661,19.782 37.711,19.782 v2(37.911,19.582)
UDQS: R51.1 U1.A15 | length 16
  Top w0.127: U1.A15@25.469,18.75 25.729,18.75 25.861,18.882 28.311,18.882 29.511,20.082 v2(30.211,20.082)
  Bottom w0.127: v2(30.211,20.082) 30.261,20.132 31.111,20.132 39.882,20.132 R51.1@40.605,19.409
UDQS_B: R51.2 R53.2 U2.51 | length 7.8
  Top w0.127: v2(41.961,18.432) 41.961,18.232 42.311,17.882 45.668,14.525 U2.51@46.555,14.525
  Bottom w0.127: R51.2@41.405,19.409 41.411,19.403 41.411,18.682 41.411,18.526 R53.2@41.405,18.52 41.493,18.432 v2(41.961,18.432)
USB_DM: R102.2 U1.A50 | length 4.8
  Top w0.127: R102.2@11.907,23.1 11.811,23.004 11.811,20.632 12.693,19.75 U1.A50@13.731,19.75
USB_DP: R101.2 U1.B43 | length 6.3
  Top w0.064: 12.411,19.532 12.443,19.5 U1.B43@14.481,19.5
  Top w0.127: R101.2@10.891,23.1 10.891,23.002 10.991,23.002 11.461,22.532 11.461,20.482 12.411,19.532
USB_POWER: R18.1 R112.1 | length 25.2
  Top w0.127: R18.1@8.459,22.053 7.94,22.053 6.061,23.932 6.061,29.782 9.311,33.032 9.311,37.832 9.411,37.932 11.961,40.482 11.961,41.582 12.611,42.232 v4(12.961,42.232)
  Bottom w0.127: v4@12.946,42.232 R112.1@12.946,42.885
  Bottom w0.406: v4@12.946,42.232 v4(12.961,42.232)
VBUS: C113.2 C115.2 R113.2 U6.1 USB2.1 | length 12.4
  Top w0.127: C113.2@13.545,39.322 13.558,39.309 C113.2@13.608,39.309 C113.2@13.608,39.332 ; v1@20.061,41.532 v1(20.111,41.582)
  Top w0.406: C115.2@15.128,39.113 C115.2@15.128,39.259
  Top w0.5: C113.2@13.608,39.309 14.932,39.309 C115.2@15.128,39.113
  Top w0.6: v1@19.961,41.732 19.961,41.632 v1@20.061,41.532
  Top w1: USB2.1@11.241,38.002 12.561,39.322 ; 12.561,39.332 12.561,39.322 ; C113.2@13.545,39.322 12.561,39.322 ; C113.2@13.608,39.332 16.661,39.332 16.811,39.482 19.061,41.732 v1@19.961,41.732
  other v1: 19.261,41.582
VDD: C8.1 C9.2 C10.2 C11.2 C12.2 C13.2 C14.2 C15.1 C103.1 Q2.3 R59.1 TPDDR.1 U2.1 U2.3 U2.9 U2.15 U2.18 U2.33 U2.55 U2.61 | length 19.6
  Top w0.127: U2.9@35.355,19.075 v4@36.304,19.075 ; U2.1@35.355,24.275 35.554,24.275 v2(36.161,24.882) ; C103.1@41.311,25.932 41.311,25.927 C103.1@41.336,25.902 ; v2(45.611,21.032) 45.611,21.025 U2.61@46.555,21.025 ; v4@36.304,19.075 36.311,19.075 v4(36.311,19.082) v4@36.304,19.075
  Top w0.254: U2.33@35.355,3.475 35.311,3.475 35.311,3.482 36.361,3.482 v2(36.361,3.432) ; U2.18@35.355,13.225 36.304,13.225 v4(36.311,13.232) ; U2.15@35.355,15.175 36.254,15.175 v4(36.311,15.232) ; U2.3@35.355,22.975 36.154,22.975 v4(36.311,23.132) ; v4(45.561,17.082) 45.604,17.125 U2.55@46.555,17.125
  Top w0.406: C103.1@41.311,25.932 41.361,25.982 41.411,26.032 v2(42.561,26.032) 43.145,26.032 TPDDR.1@43.264,25.913
  Top w0.6: Q2.3@38.846,26.033 38.846,25.932 C103.1@41.311,25.932
  Bottom w0.127: v4@36.261,19.082 v4(36.311,19.082) ; R59.1@46.211,15.082 46.262,15.082 46.29,15.082 R59.1@46.312,15.06
  Bottom w0.406: v2(36.161,24.882) 36.223,24.82 C13.2@36.872,24.82 ; v4@36.261,19.082 v4(36.311,19.082) 36.541,19.082 C12.2@36.899,18.724 ; v4(36.311,13.232) 36.407,13.136 C14.2@36.922,13.136 ; v4(36.311,15.232) 36.361,15.182 C9.2@36.861,15.182 ; v4(36.311,23.132) 36.361,23.082 C11.2@36.861,23.082 ; v2(36.361,3.432) 36.413,3.484 C10.2@36.899,3.484 ; v4(45.561,17.082) 46.422,17.082 C8.1@46.489,17.015 ; v2(45.611,21.032) 45.658,21.079 C15.1@46.389,21.079 ; R59.1@46.211,15.082 v4@45.711,15.582 ; v4@45.711,15.582 v4(45.511,15.582) v4@45.711,15.582
VDDQ: 
  other v4: 45.611,21.032
VREF: 
XIN: C60.2 U1.A73 Y1.3 | length 7.5
  Top w0.127: Y1.3@16.62,5.203 16.832,5.203 16.832,5.253 17.661,6.082 17.661,8.314 ; C60.2@17.206,8.314 17.661,8.314 ; C60.2@17.261,8.332 17.661,8.332 ; U1.A73@17.35,11.131 17.35,9.593 17.661,9.282 17.661,8.332 ; 17.661,8.314 17.661,8.332
XOUT: C61.1 U1.B63 Y1.1 | length 6.4
  Top w0.064: U1.B63@17.6,11.881 17.6,10.671 17.6,10.493 17.611,10.482
  Top w0.127: 17.611,10.482 17.611,9.732 17.911,9.432 17.911,8.332 18.311,8.332 C61.1@18.311,8.314 17.911,8.314 17.911,7.632 18.69,6.853 Y1.1@18.77,6.853
pads on no net: E$1.1 E$2.1 E$3.1 E$4.1 E$5.1 E$6.1 SW2.1 SW2.P$1 SW2.P$2 T1.4 T1.5 T1.12 T1.13 U1.A27 U1.A28 U1.A29 U1.A34 U1.A35 U1.A36 U1.A37 U1.A39 U1.A40 U1.A41 U1.A42 U1.A51 U1.A59 U1.A60 U1.B22 U1.B23 U1.B24 U1.B25 U1.B29 U1.B30 U1.B32 U1.B33 U1.B34 U1.B35 U1.B37 U1.B38 U1.B52 U1.B53 U1.B54 U1.B71 U2.14 U2.17 U2.19 U2.25 U2.43 U2.50 U2.53 USB1.D+ USB1.D- USB1.ID

## Polygon pours and split planes (outlines as drawn)
S$107 on Top "Polygon_1_Net_S$107" (solid, remove dead copper, pour order 8): 2.808,48.845 9.275,48.845 9.275,46.419 8.297,46.419 8.297,47.869 4.525,47.869 4.525,46.368 3.448,46.368 3.448,47.819 2.947,47.819 2.947,48.706
SHIELD on Top "Polygon_1_Net_SHIELD" (solid, remove dead copper, pour order 9): 26.574,44.918 26.574,50.521 12.048,50.395 11.997,45.42 13.887,45.368 14.771,46.253 14.972,47.858 15.194,48.169 17.888,48.169 18.766,47.437 19.598,46.409 19.598,43.506 20.984,42.068 25.025,42.068 25.025,44.918
+5V0 on Top "Polygon_2_Net_+5V0" (solid, remove dead copper, pour order 1): 18.317,44.769 18.704,44.769 ccw(c18.786,45.157) 19.174,45.073 19.224,45.827 ccw(c18.936,45.857) 18.964,46.145 18.374,46.145 18.374,47.095 18.047,47.095 18.047,45.376 ccw(c18.136,45.207) 17.947,45.176 17.947,45.026 ccw(c18.261,45.082)
GND on Top "Polygon_1_Net_GND" (solid, remove dead copper, pour order 7): 43.537,51.063 49.063,51.063 49.063,-0.063 -0.064,-0.082 -0.064,46.396 9.446,46.346 9.396,48.494 11.523,48.547 11.575,45.906 8.768,43.147 12.684,43.195 15.247,45.758 15.196,47.646 17.611,47.646 17.661,47.646 18.124,47.646 18.124,47.437 18.369,44.596 19.124,44.596 19.124,43.449 20.147,41.696 43.547,41.895
LX on Bottom "Polygon_1_Net_LX" (solid, remove dead copper, pour order 3): 1.798,37.785 1.798,34.769 4.024,34.769 4.024,35.258 2.474,36.808 2.474,37.695 1.976,37.695
+5V0 on Bottom "Polygon_1_Net_+5V0" (solid, remove dead copper, pour order 6): 4.371,36.855 4.425,38.207 3.074,39.558 3.074,41.406 3.937,42.268 6.639,42.268 9.189,45.018 18.098,45.018 18.098,43.668 22.724,43.668 22.724,44.958 21.687,45.995 8.686,45.945 6.835,44.195 5.534,44.144 4.885,43.495 3.134,43.495 1.797,42.107 1.848,39.855 3.796,37.907 3.745,36.98
VBUS on Bottom "Polygon_1_Net_VBUS" (solid, remove dead copper, pour order 4): 18.198,41.068 21.387,41.068 22.474,42.156 22.474,42.845 21.148,42.845 21.148,42.045 18.198,42.045
+3V3 on Bottom "Polygon_1_Net_+3V3" (solid, remove dead copper, pour order 5): 1.947,33.196 1.947,30.519 5.337,30.519 5.774,30.956 5.774,33.196
S$18 on Bottom "Polygon_1_Net_S$18" (solid, remove dead copper, pour order 0): 15.158,9.52 16.635,9.466 16.516,10.293 15.248,10.348 15.248,10.196 15.035,10.196
S$117 on Bottom "Polygon_1_Net_S$117" (solid, remove dead copper, pour order 2): 15.798,11.567 17.925,11.62 17.925,13.005 18.424,12.904 18.424,13.345 17.781,13.345 17.498,13.005 17.498,12.808 17.335,12.645 16.185,12.645 15.798,12.258
GND on Bottom "Polygon_2_Net_GND" (solid, remove dead copper, pour order 10): -0.064,51.063 49.063,51.063 49.063,-0.064 -0.064,-0.064

## Keep-outs
Keep-Out Layer:
  lines w0: 1.47,43.29 0.03,43.49 0.03,4.86 ccw(c4.4,4.86) 4.4,0.49 44.61,0.49 ccw(c44.61,4.43) 48.55,4.43 48.55,44.19 ccw(c44.22,44.19) 44.22,48.52 43.6,48.52 43.6,50 40.19,50 40.19,42.04 26.5,42.04 26.5,50 22.34,50 22.34,50.57 11.52,50.57 11.52,48.6 9.01,48.6 9.01,49.35 2.56,49.35

## Silkscreen, mask and mechanical layers (free items; w line width, h text height)
Top Overlay:
  lines w0.127: 3.298,2.268 3.298,2.776 ; 3.298,3.157 3.298,3.665 ; 4.695,2.268 4.695,2.776 ; 4.695,3.157 4.695,3.665 ; 6.065,3.157 6.065,3.665 ; 6.192,2.141 6.7,2.141 ; 6.319,3.03 6.827,3.03 ; 6.319,3.919 6.827,3.919 ; 6.954,2.268 6.954,2.776 ; 7.462,2.268 7.462,2.776 ; 7.589,2.141 8.097,2.141 ; 7.589,3.03 8.097,3.03 ; 7.589,3.919 8.097,3.919 ; 8.224,3.157 8.224,3.665
  text "CA-F121" at 2.713,4.731 h1.97
  text "02002" at 8.478,2.218 h2.76
Dimension:
  lines w0: 1.469,43.289 1.6,43.295 1.709,43.317 1.815,43.347 1.912,43.382 2.009,43.431 2.108,43.493 2.205,43.573 2.294,43.662 2.396,43.794 2.48,43.96 2.539,44.151 2.559,44.27 2.559,44.375 ; 1.47,43.29 0.03,43.49 0.03,4.86 ccw(c4.4,4.86) 4.4,0.49 44.61,0.49 ccw(c44.61,4.43) 48.55,4.43 48.55,44.19 ccw(c44.22,44.19) 44.22,48.52 43.6,48.52 43.6,50 40.19,50 40.19,42.04 26.5,42.04 26.5,50 22.34,50 22.34,50.57 11.52,50.57 11.52,48.6 9.01,48.6 9.01,49.35 2.56,49.35 ; 2.559,44.372 2.559,49.35
tPlace:
  text "2050500187" at 14.039,41.915 h2.09
  text "Rev:1.1" at 15.79,39.806 h1.97
Unrouted:
  lines w0: 3.552,30.681 4.961,26.882 11.295,25.282 ; 4.706,16.276 10.111,15.532 ; 5.061,41.782 5.588,35.615 ; 10.203,12.94 10.211,12.932 ; 10.511,19.032 10.814,15.518 ; 10.814,12.932 16.756,13.867 ; 11.461,25.282 11.561,19.682 ; 12.411,32.332 18.311,31.932 ; 13.073,27.695 16.41,30.242 ; 13.333,49.177 20.533,49.177 ; 13.453,34.049 13.511,34.041 ; 13.962,41.422 15.719,36.022 ; 15.753,34.999 16.894,31.127 22.709,27.664 ; 15.811,9.676 16.361,9.632 ; 16.348,9.676 16.361,9.732 ; 17.511,13.932 18.153,13.917 ; 18.846,26.244 21.42,26.244 ; 19.85,22.869 20.385,7.86 ; 22.417,7.821 28.661,2.482 ; 23.561,26.632 25.808,23.55 35.061,27.632 ; 24.812,44.982 39.407,37.597 ; 35.355,22.975 35.355,24.275 ; 36.11,28.453 37.311,32.532 ; 36.154,22.975 36.541,19.082 ; 36.254,15.175 36.311,13.232 ; 36.861,15.182 36.849,15.168 36.899,18.724 ; 36.872,24.82 38.846,25.932 ; 36.899,3.484 36.922,13.136 ; 43.264,25.913 45.658,21.079 ; 45.511,15.582 45.561,17.082 ; 46.555,17.125 46.555,21.025
Measures:
  lines w0: 2.56,44.38 2.56,44.46
InternalViasPCB:
  circle w0: c9.372,16.586 r0.212
  text "L" at 9.711,16.141 h1.26
Black:
  text "TL-WR703N" at 50,47 h2.76
  text "150M 802.11n Wi-Fi Router" at 50,44 h2.2
  text "Reverse Engineering Work" at 50,41 h1.57
  text "http://squonk42.github.com/TL-WR703N/" at 50,39 h1.57
  text "Based on teardown performed by Kean" at 50,34 h1.57
  text "on the OpenWRT forums, see:" at 50,32 h1.57
  text "http://www.kean.com.au/oshw/WR703N/teardown/" at 50,30 h1.57
  text "Â© 2012, Michel Stempin. All rights reserved." at 50.32,5.62 h1.57
  text "Licensed under a Creative Commons" at 50.32,4.08 h1.57
  text "Attribution-Share-Alike Unported License." at 50.32,2.54 h1.57
  text "See creativecommons.org/licenses/by-sa/3.0/" at 50.32,1 h1.57
WhiteOver:
  circle w2.54: c72.856,17.51 r1.103
  circle w2.54: c65.693,17.51 r1.103
  circle w3.81: c55.152,16.418 r1.27

## Text inside footprints (layer, text, board x,y; h text height)
E$7: Black "CC-BY-SA" at 58.81,8.29 h2.76; tFinish "AR9331-AL1A" at 15.468,16.708 h1.26